# Altium PCB LEADER_10_15.PcbDoc
Units mm, origin at the board's own origin, x right, y up, seen from the top; angles counter-clockwise.
Board outline 60 x 72 mm, 4 copper layers (Top Layer, Mid-Layer 1, Mid-Layer 2, Bottom Layer); 42 components, 40 nets, 211 pads, 93 vias.
Unrouted connection lines stored in the file: 49.
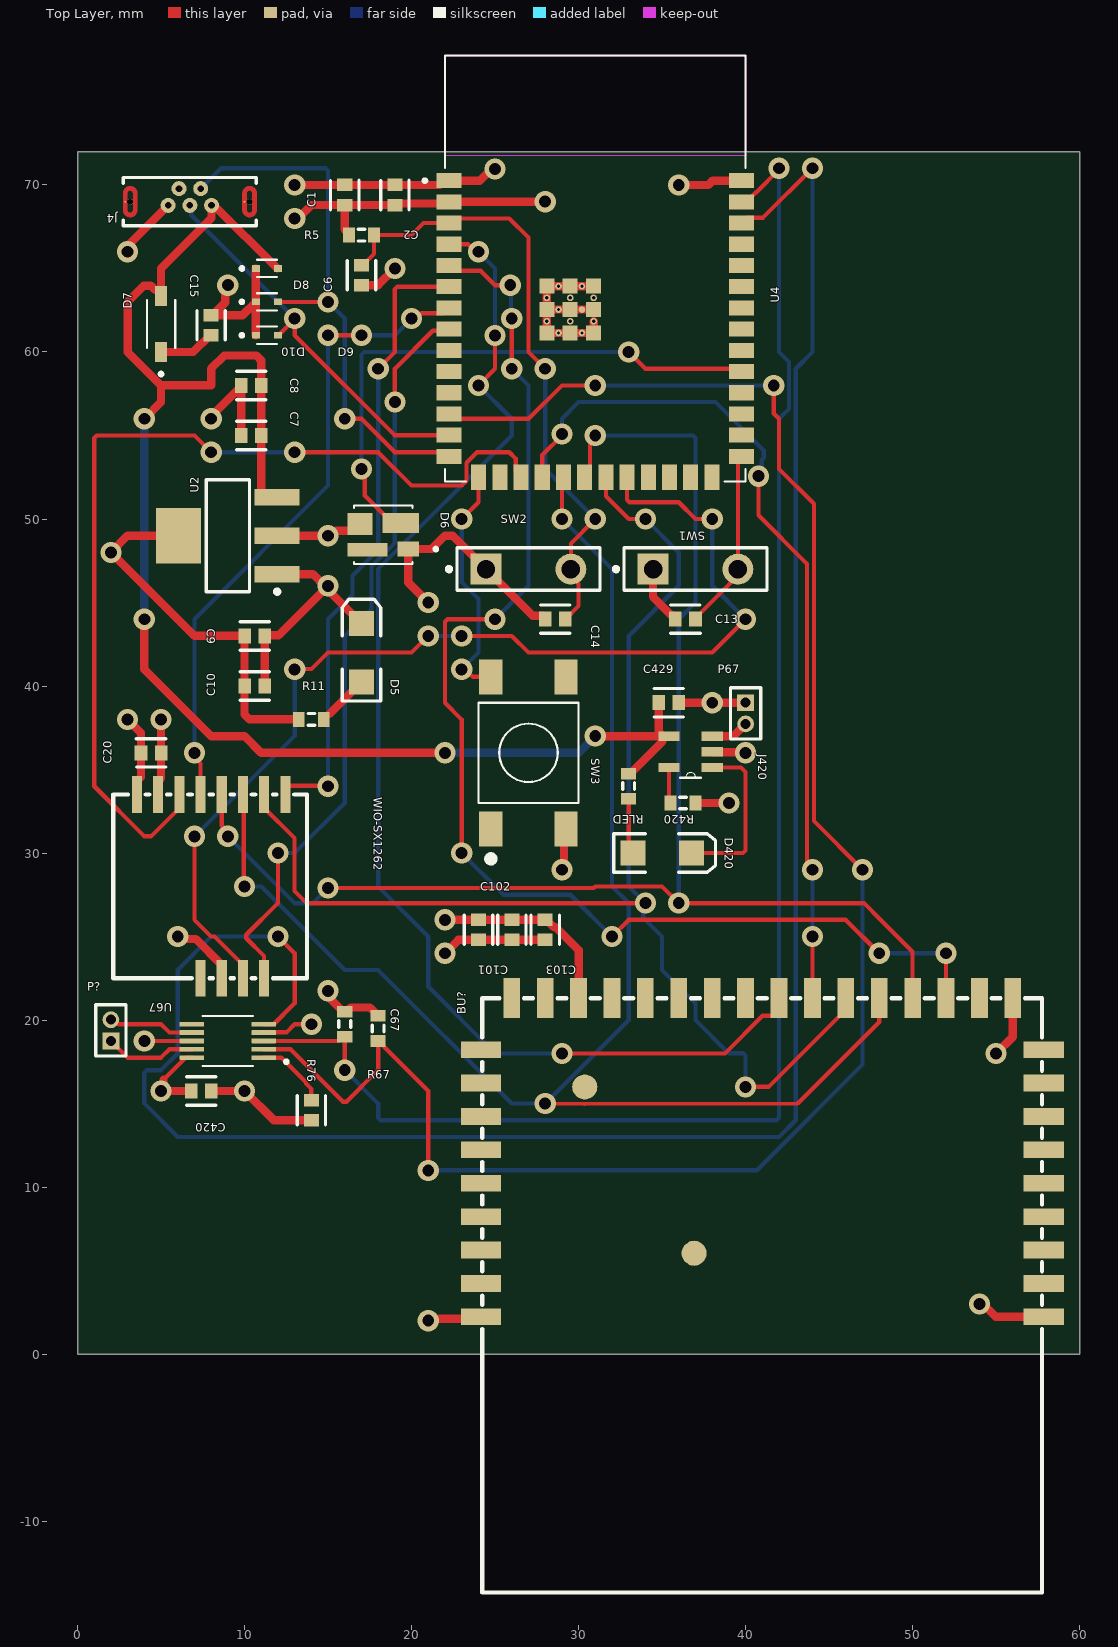
[diagram p0: Top Layer view]
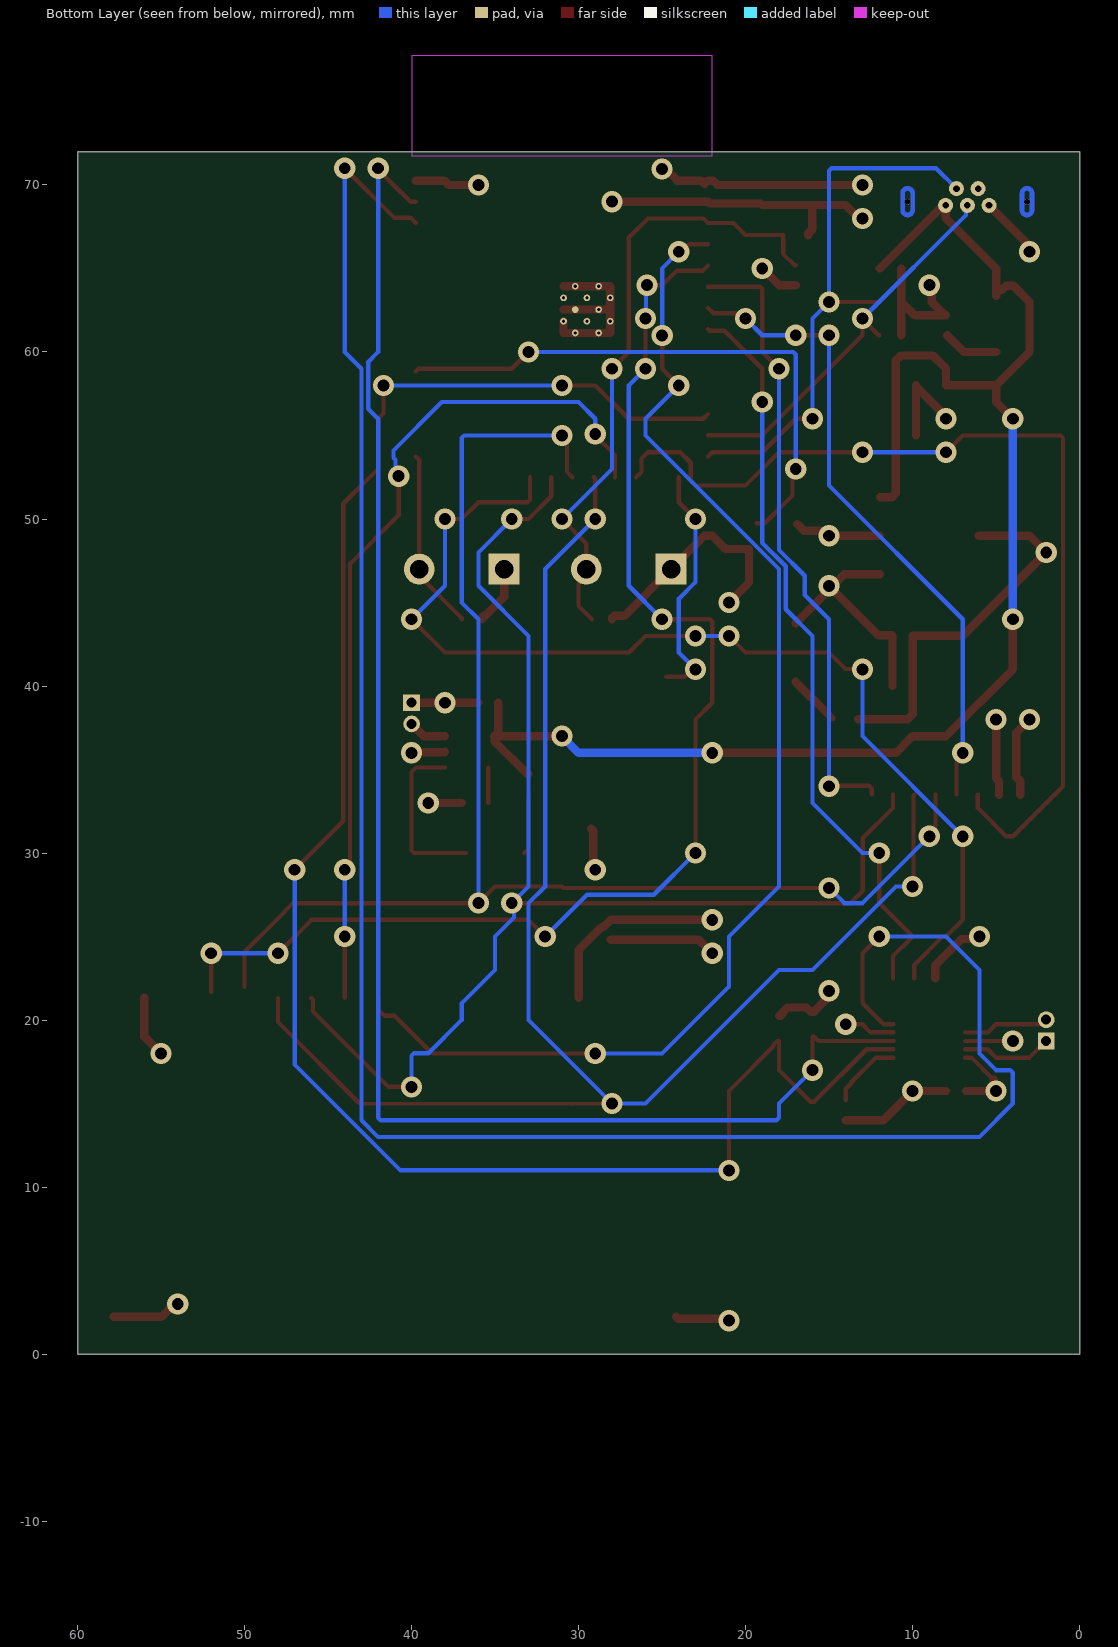
[diagram p1: Bottom Layer view, seen from below]
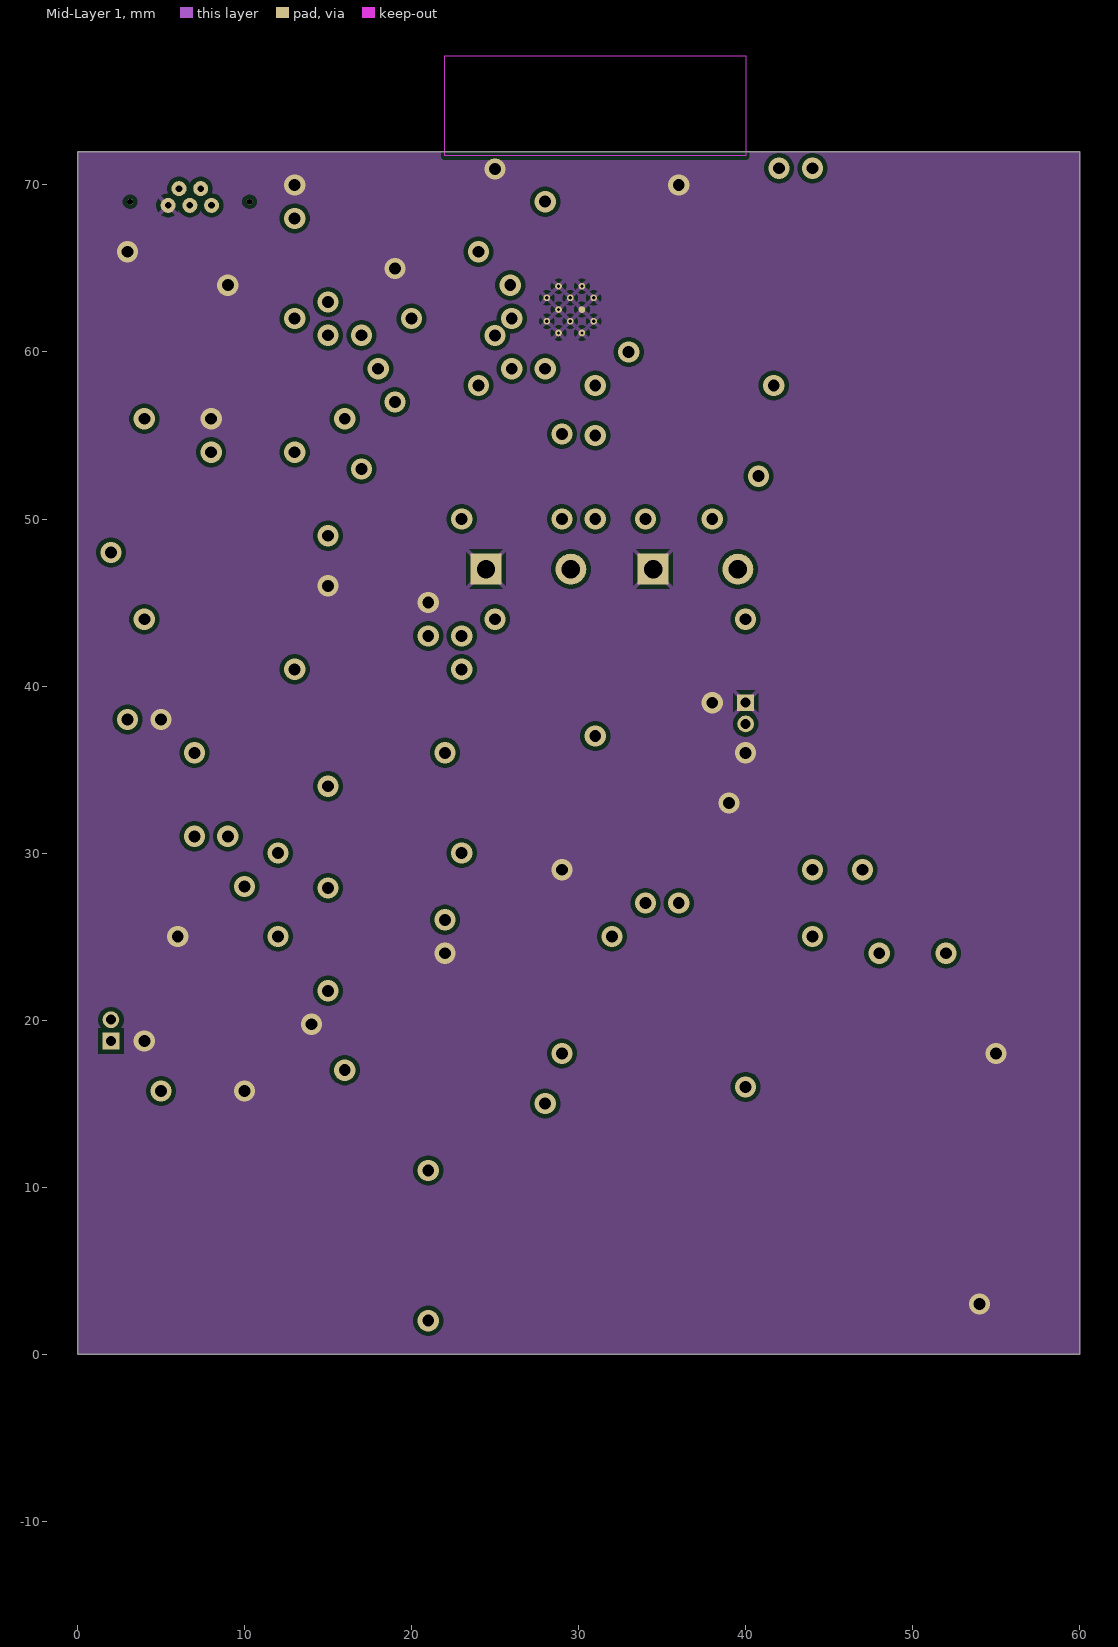
[diagram p2: Mid-Layer 1]
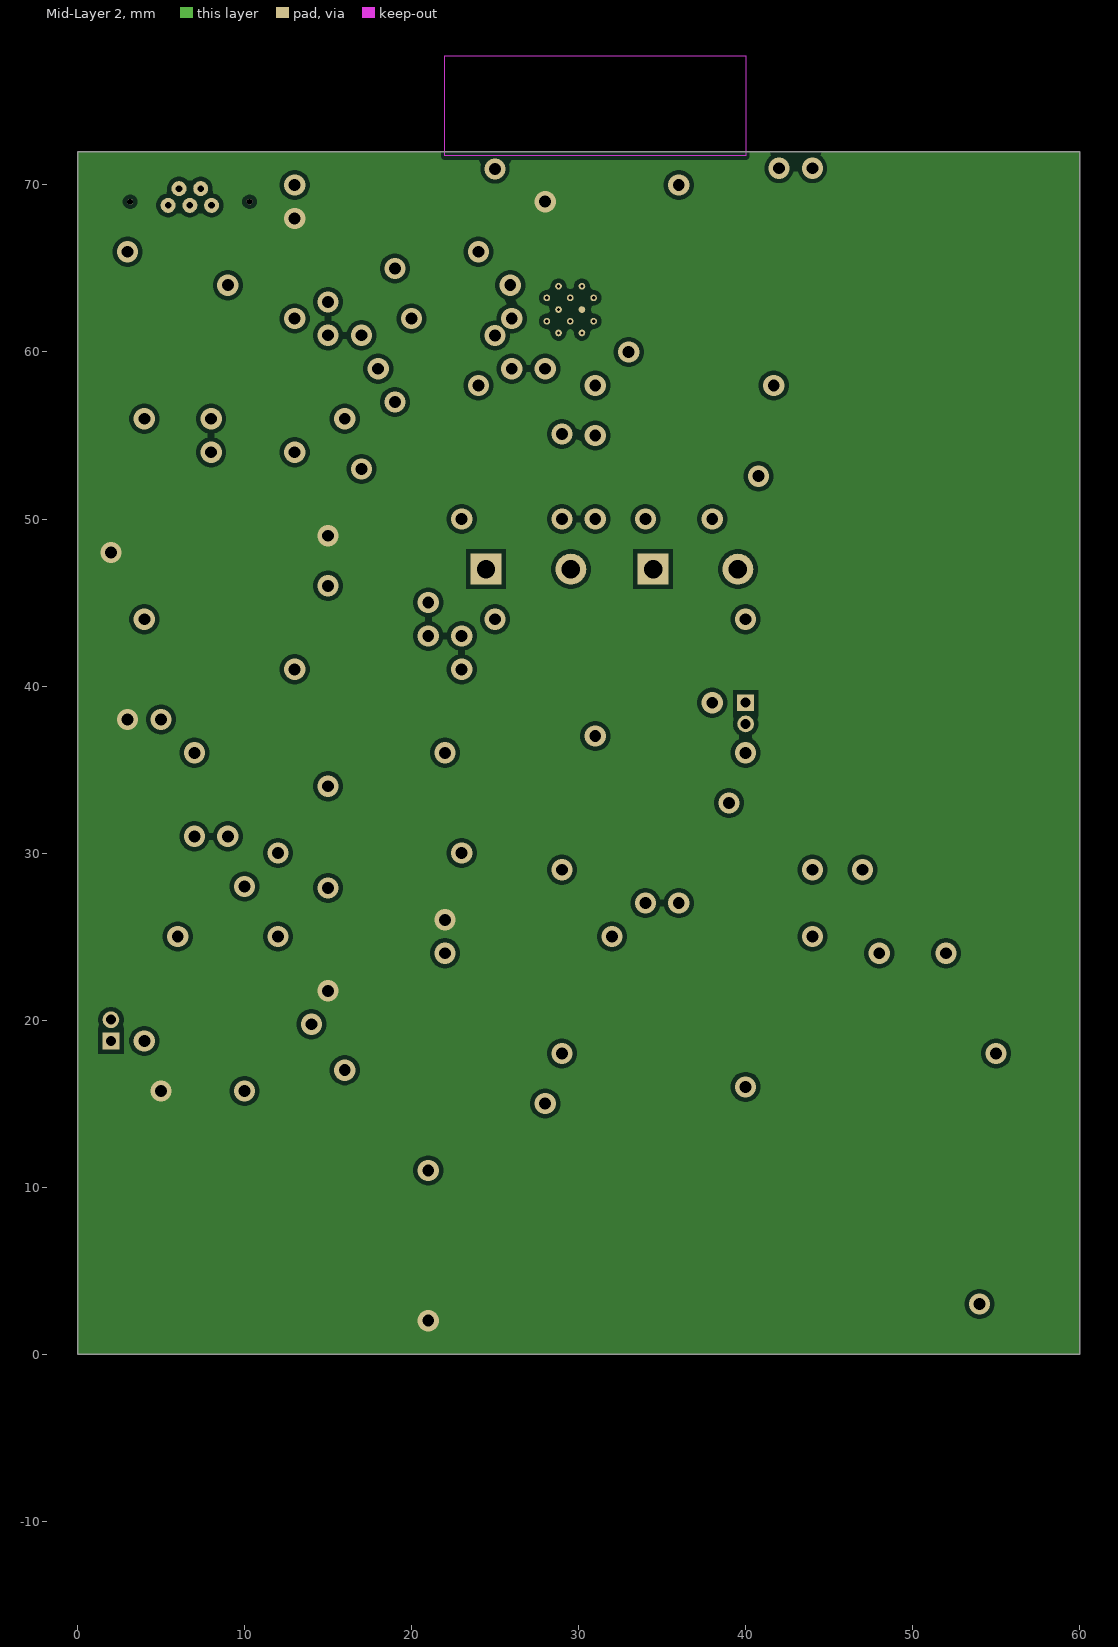
[diagram p3: Mid-Layer 2]
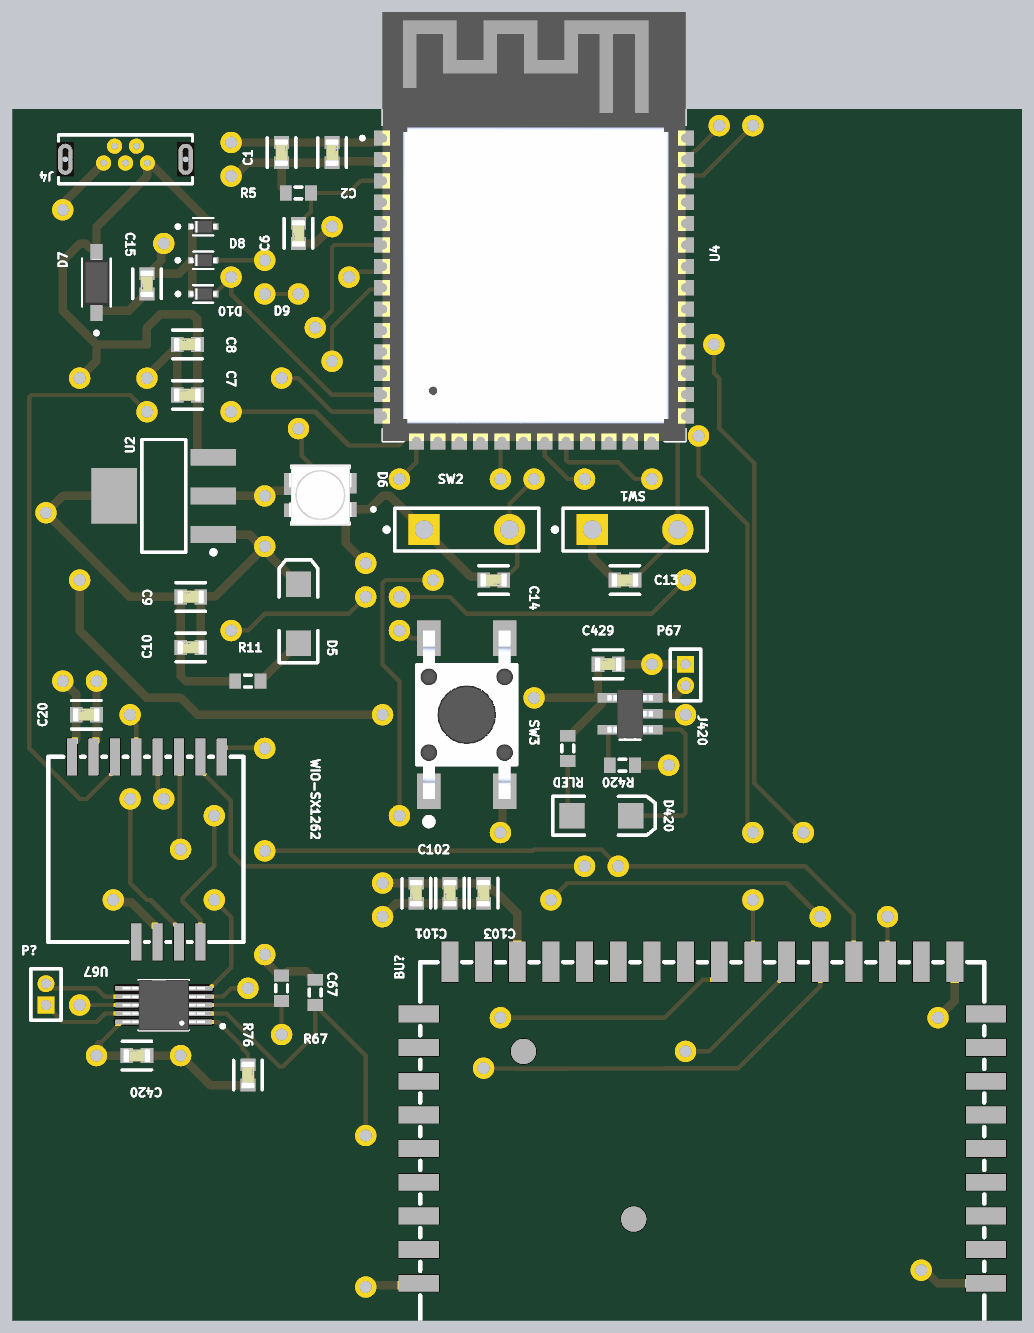
[diagram p4: 3D render of the assembled board from above, using the file's embedded part models]

## Layer stack, top to bottom
Top Solder: solder mask 0.0102, Solder Resist, Dk 3.5
Top Layer: signal copper 0.0356
Dielectric 1: dielectric 0.32, FR-4, Dk 4.8
Mid-Layer 1: signal copper 0.0356
Dielectric3: dielectric 0.32, FR-4, Dk 4.8
Mid-Layer 2: signal copper 0.0356
Dielectric2: dielectric 0.32, FR-4, Dk 4.8
Bottom Layer: signal copper 0.0356
Bottom Solder: solder mask 0.0102, Solder Resist, Dk 3.5

## Board outline
0,0 60,0 60,72 0,72

## Design rules (kind name [scope] priority, off if disabled: settings)
Clearance poly_clear [InPolygon] p1: gap=0.254 ignorepadtopadclearanceinfootprint=FALSE
Clearance [All] p2: gap=0.15 ignorepadtopadclearanceinfootprint=FALSE
Clearance U67_Clearance [InComponent('U67')] p3: gap=0.15 ignorepadtopadclearanceinfootprint=FALSE
HoleToHoleClearance [All] p1: gap=0.1 allowstackedmicrovias=TRUE
MinimumSolderMaskSliver [All] p1: minsoldermaskwidth=0.01
PolygonConnect [All] p1: thpad.connectstyle=Relief thpad.reliefconductorwidth=0.254 thpad.reliefentries=4 thpad.polygonreliefangle="45 Angle" thpad.airgapwidth=0.254 smdpad.connectstyle=Relief smdpad.reliefconductorwidth=0.254 smdpad.reliefentries=4 smdpad.polygonreliefangle="90 Angle" smdpad.airgapwidth=0.254 via.connectstyle=Direct via.reliefconductorwidth=0.254 via.reliefentries=4 via.polygonreliefangle="90 Angle" via.airgapwidth=0.254
RoutingVias [All] p1: holewidth=0.711 width=1.27 viastyle="Through Hole" minholewidth=0.711 minwidth=1.27 maxholewidth=0.711 maxwidth=1.27
SilkToSilkClearance [All] p1: silktosilkclearance=0.1
SilkToSolderMaskClearance [IsPad] p1: minsilkscreentomaskgap=0.1 clearancetoexposedcopper=TRUE
SolderMaskExpansion [All] p1: expansion=0 istentingtop=FALSE
Width C15 [InNet('C15_1')] p1: maxlimit=0.7 minlimit=0.254 preferedwidth=0.4
Width 3V3_Width [InNet('3V3')] p2: maxlimit=0.7 minlimit=0.254 preferedwidth=0.5
Width GD_WIDTH [InNet('GND')] p3: maxlimit=0.7 minlimit=0.254 preferedwidth=0.5
Width 5V_Width [InNet('5V')] p4: maxlimit=0.7 minlimit=0.254 preferedwidth=0.5
Width [All] p5: maxlimit=0.7 minlimit=0.254 preferedwidth=0.254
26 further rules are at their usual default settings.

## Components (designator, comment, footprint, x,y, rotation, side; value= is the part's Value field where it differs from the comment)
BU? "7.9872GHz；6.4896GHz" WIRELM-SMD_BU04 41,11.777 r180 top
C1 "Cap" FP-C0603C-CF-MFG 19,69.4 r270 top value=10uF
C2 "Cap" FP-C0603C-CF-MFG 16,69.4 r270 top value=1uF
C6 "Cap" FP-C0603C-CF-MFG 17,64.6 r90 top value=1uF
C7 "Cap" FP-C0603C-CF-MFG 10.4,55 r0 top value=10uF
C8 "Cap" FP-C0603C-CF-MFG 10.4,58 r0 top value=.1uF
C9 "Cap" FP-C0603C-CF-MFG 10.6,43 r0 top value=.1uF
C10 "Cap" FP-C0603C-CF-MFG 10.6,40 r0 top value=10uF
C13 "Cap" FP-C0603C-CF-MFG 36.4,44 r180 top value=.1uF
C14 "Cap" FP-C0603C-CF-MFG 28.6,44 r180 top value=.1uF
C15 "Cap" FP-C0603C-CF-MFG 8,61.6 r90 top value=10uF
C20 "Cap" FP-C0603C-CF-MFG 4.4,36 r0 top value=1uF
C67 "Cap" FP-C0603C-CF-MFG 14,14.6 r270 top value=1uF
C101 "Cap" FP-C0603C-CF-MFG 24,25.4 r90 top value=100nF
C102 "Cap" FP-C0603C-CF-MFG 26,25.4 r90 top value=1uF
C103 "Cap" FP-C0603C-CF-MFG 28,25.4 r90 top value=10uF
C420 "Cap" FP-C0603C-CF-MFG 7.4,15.75 r0 top value=1uF
C429 "Cap" FP-C0603C-CF-MFG 35.4,39 r0 top value=4.7uF
D5 "LED2" 3.2X1.6X1.1 17,42 r90 top
D6 "SK6812MINI-012" LED_SK6812MINI-012 18.3,49.05 r180 top
D7 "1N5819HW-7-F" SOD3715X145N 5,61.68 r90 top
D8 "LESD5D5.0CT1G" TVS_LESD5D5.0CT1G 11.34,65 r0 top
D9 "LESD5D5.0CT1G" TVS_LESD5D5.0CT1G 11.34,61 r0 top
D10 "LESD5D5.0CT1G" TVS_LESD5D5.0CT1G 11.34,63 r0 top
D420 "LED2" 3.2X1.6X1.1 35,30 r0 top
J4 "USB3130-XX-X_REVD" GCT_USB3130-XX-X_REVD 6.725,69 r180 top
J420 "MCP73831T-2ACI/OT" SOT95P280X145-5N 36.705,36.06 r180 top
P67 "Header 2" MHDR1X2 40,39 r270 top
P? "Header 2" MHDR1X2 2,18.75 r90 top
R5 "Res3" J1-0603 17,67 r0 top value=10K
R11 "Res3" J1-0603 14,38 r0 top value=5.1K
R67 "Res3" J1-0603 18,19.5 r90 top value=4.7K
R76 "Res3" J1-0603 16,19.75 r90 top value=4.7K
R420 "Res3" J1-0603 36.25,33 r0 top value=10K
RLED "Res3" J1-0603 33,34 r270 top value=1K
SW1 "NTC013-AT1J-A160T" SPST-2 37,47 r0 top
SW2 "NTC013-AT1J-A160T" SPST-2 27,47 r0 top
SW3 "4-1437565-9" TE_4-1437565-9 27,36 r90 top
U2 "SGM2212-3.3XKC3G/TR" SOT223_M 9,49 r180 top
U4 "ESP32-S3-WROOM-1" XCVR_ESP32S3WROOM1N8R8 31,65 r0 top
U67 "DRV2605LDGST" SOP50P490X110-10N 9,18.75 r180 top
WIO-SX1262 "WIO-SX1262" WIRELM-SMD_WIO-SX1262 8,28 r180 top

## Footprints (in the part's own frame and the unit in brackets; to place one, negate y for a bottom-side part, rotate by r counter-clockwise, add the part's x,y. Pads: shape width x height; smd on the part's side, far side on the other; paste and mask are expansions set on the pad)
3.2X1.6X1.1 [mm] "SMT LED; 2 Flat Leads"
  rect 1.5x1.5 smd: 1(-1.75,0) 2(1.75,0)
  silkscreen extent -2.9,-1.15 3.2,1.15
FP-C0603C-CF-MFG [mm]
  rect 0.75x0.9 smd paste+0 mask+0: 1(-0.6,0) 2(0.6,0)
  silkscreen extent -0.88,-0.85 0.88,0.85, body extent -1.2,-0.6 1.2,0.6, height 0.25
GCT_USB3130-XX-X_REVD [mm]
  round 0.9 hole 0.4: 1(-1.3,0.22) 2(-0.65,-0.78) 3(0,0.22) 4(0.65,-0.78) 5(1.3,0.22)
  rect 0.1x0.1 smd paste-1 mask+0: 6(-3.275,0) 7(3.875,0)
  round 0.35 hole 0.35 unplated: ""(-3.575,0) ""(3.575,0)
  Top Layer region: -3.553,0.924 -3.531,0.923 -3.509,0.92 -3.487,0.916 -3.465,0.911 -3.444,0.904 -3.423,0.897 -3.402,0.888 -3.382,0.879 -3.362,0.868 -3.344,0.856 -3.325,0.844 -3.308,0.83 -3.291,0.816 -3.274,0.801 -3.259,0.784 -3.245,0.767 -3.231,0.75 -3.219,0.731 -3.207,0.712 -3.196,0.693 -3.187,0.673 -3.178,0.652 -3.171,0.631 -3.164,0.61 -3.159,0.588 -3.155,0.566 -3.152,0.544 -3.151,0.522 -3.15,0.5 -3.15,0 -3.4,0 -3.4,0.5 -3.4,0.509 -3.401,0.518 -3.402,0.527 -3.404,0.536 -3.406,0.545 -3.409,0.554 -3.412,0.563 -3.415,0.571 -3.419,0.579 -3.423,0.587 -3.428,0.595 -3.433,0.603 -3.439,0.61 -3.445,0.617 -3.451,0.624 -3.458,0.63 -3.465,0.636 -3.472,0.642 -3.48,0.647 -3.487,0.652 -3.496,0.656 -3.504,0.66 -3.512,0.663 -3.521,0.666 -3.53,0.669 -3.539,0.671 -3.548,0.673 -3.557,0.674 -3.566,0.675 -3.584,0.675 -3.593,0.674 -3.602,0.673 -3.611,0.671 -3.62,0.669 -3.629,0.666 -3.638,0.663 -3.646,0.66 -3.654,0.656 -3.663,0.652 -3.67,0.647 -3.678,0.642 -3.685,0.636 -3.692,0.63 -3.699,0.624 -3.705,0.617 -3.711,0.61 -3.717,0.603 -3.722,0.595 -3.727,0.588 -3.731,0.579 -3.735,0.571 -3.738,0.563 -3.741,0.554 -3.744,0.545 -3.746,0.536 -3.748,0.527 -3.749,0.518 -3.75,0.509 -3.75,0.5 -3.75,0 -4,0 -4,0.5 -3.999,0.522 -3.998,0.544 -3.995,0.566 -3.991,0.588 -3.986,0.61 -3.979,0.631 -3.972,0.652 -3.963,0.673 -3.954,0.693 -3.943,0.713 -3.931,0.731 -3.919,0.75 -3.905,0.767 -3.891,0.784 -3.876,0.801 -3.859,0.816 -3.842,0.83 -3.825,0.844 -3.806,0.856 -3.788,0.868 -3.768,0.879 -3.748,0.888 -3.727,0.897 -3.706,0.904 -3.685,0.911 -3.663,0.916 -3.641,0.92 -3.619,0.923 -3.597,0.924 -3.575,0.925
  Top Layer region: -3.15,-0.5 -3.151,-0.522 -3.152,-0.544 -3.155,-0.566 -3.159,-0.588 -3.164,-0.61 -3.171,-0.631 -3.178,-0.652 -3.187,-0.673 -3.196,-0.693 -3.207,-0.712 -3.219,-0.731 -3.231,-0.75 -3.245,-0.767 -3.259,-0.784 -3.274,-0.801 -3.291,-0.816 -3.308,-0.83 -3.325,-0.844 -3.344,-0.856 -3.362,-0.868 -3.382,-0.879 -3.402,-0.888 -3.423,-0.897 -3.444,-0.904 -3.465,-0.911 -3.487,-0.916 -3.509,-0.92 -3.531,-0.923 -3.553,-0.924 -3.575,-0.925 -3.597,-0.924 -3.619,-0.923 -3.641,-0.92 -3.663,-0.916 -3.685,-0.911 -3.706,-0.904 -3.727,-0.897 -3.748,-0.888 -3.768,-0.879 -3.788,-0.868 -3.806,-0.856 -3.825,-0.844 -3.842,-0.83 -3.859,-0.816 -3.876,-0.801 -3.891,-0.784 -3.905,-0.767 -3.919,-0.75 -3.931,-0.731 -3.943,-0.713 -3.954,-0.693 -3.963,-0.673 -3.972,-0.652 -3.979,-0.631 -3.986,-0.61 -3.991,-0.588 -3.995,-0.566 -3.998,-0.544 -3.999,-0.522 -4,-0.5 -4,0 -3.75,0 -3.75,-0.5 -3.75,-0.509 -3.749,-0.518 -3.748,-0.527 -3.746,-0.536 -3.744,-0.545 -3.741,-0.554 -3.738,-0.563 -3.735,-0.571 -3.731,-0.579 -3.727,-0.588 -3.722,-0.595 -3.717,-0.603 -3.711,-0.61 -3.705,-0.617 -3.699,-0.624 -3.692,-0.63 -3.685,-0.636 -3.678,-0.642 -3.67,-0.647 -3.663,-0.652 -3.654,-0.656 -3.646,-0.66 -3.638,-0.663 -3.629,-0.666 -3.62,-0.669 -3.611,-0.671 -3.602,-0.673 -3.593,-0.674 -3.584,-0.675 -3.566,-0.675 -3.557,-0.674 -3.548,-0.673 -3.539,-0.671 -3.53,-0.669 -3.521,-0.666 -3.512,-0.663 -3.504,-0.66 -3.496,-0.656 -3.487,-0.652 -3.48,-0.647 -3.472,-0.642 -3.465,-0.636 -3.458,-0.63 -3.451,-0.624 -3.445,-0.617 -3.439,-0.61 -3.433,-0.603 -3.428,-0.595 -3.423,-0.587 -3.419,-0.579 -3.415,-0.571 -3.412,-0.563 -3.409,-0.554 -3.406,-0.545 -3.404,-0.536 -3.402,-0.527 -3.401,-0.518 -3.4,-0.509 -3.4,-0.5 -3.4,0 -3.15,0
  Top Layer region: 3.597,0.924 3.619,0.923 3.641,0.92 3.663,0.916 3.685,0.911 3.706,0.904 3.727,0.897 3.748,0.888 3.768,0.879 3.788,0.868 3.806,0.856 3.825,0.844 3.842,0.83 3.859,0.816 3.876,0.801 3.891,0.784 3.905,0.767 3.919,0.75 3.931,0.731 3.943,0.713 3.954,0.693 3.963,0.673 3.972,0.652 3.979,0.631 3.986,0.61 3.991,0.588 3.995,0.566 3.998,0.544 3.999,0.522 4,0.5 4,0 3.75,0 3.75,0.5 3.75,0.509 3.749,0.518 3.748,0.527 3.746,0.536 3.744,0.545 3.741,0.554 3.738,0.563 3.735,0.571 3.731,0.579 3.727,0.588 3.722,0.595 3.717,0.603 3.711,0.61 3.705,0.617 3.699,0.624 3.692,0.63 3.685,0.636 3.678,0.642 3.67,0.647 3.663,0.652 3.654,0.656 3.646,0.66 3.638,0.663 3.629,0.666 3.62,0.669 3.611,0.671 3.602,0.673 3.593,0.674 3.584,0.675 3.566,0.675 3.557,0.674 3.548,0.673 3.539,0.671 3.53,0.669 3.521,0.666 3.512,0.663 3.504,0.66 3.496,0.656 3.487,0.652 3.48,0.647 3.472,0.642 3.465,0.636 3.458,0.63 3.451,0.624 3.445,0.617 3.439,0.61 3.433,0.603 3.428,0.595 3.423,0.587 3.419,0.579 3.415,0.571 3.412,0.563 3.409,0.554 3.406,0.545 3.404,0.536 3.402,0.527 3.401,0.518 3.4,0.509 3.4,0.5 3.4,0 3.15,0 3.15,0.5 3.151,0.522 3.152,0.544 3.155,0.566 3.159,0.588 3.164,0.61 3.171,0.631 3.178,0.652 3.187,0.673 3.196,0.693 3.207,0.712 3.219,0.731 3.231,0.75 3.245,0.767 3.259,0.784 3.274,0.801 3.291,0.816 3.308,0.83 3.325,0.844 3.344,0.856 3.362,0.868 3.382,0.879 3.402,0.888 3.423,0.897 3.444,0.904 3.465,0.911 3.487,0.916 3.509,0.92 3.531,0.923 3.553,0.924 3.575,0.925
  Top Layer region: 4,-0.5 3.999,-0.522 3.998,-0.544 3.995,-0.566 3.991,-0.588 3.986,-0.61 3.979,-0.631 3.972,-0.652 3.963,-0.673 3.954,-0.693 3.943,-0.713 3.931,-0.731 3.919,-0.75 3.905,-0.767 3.891,-0.784 3.876,-0.801 3.859,-0.816 3.842,-0.83 3.825,-0.844 3.806,-0.856 3.788,-0.868 3.768,-0.879 3.748,-0.888 3.727,-0.897 3.706,-0.904 3.685,-0.911 3.663,-0.916 3.641,-0.92 3.619,-0.923 3.597,-0.924 3.575,-0.925 3.553,-0.924 3.531,-0.923 3.509,-0.92 3.487,-0.916 3.465,-0.911 3.444,-0.904 3.423,-0.897 3.402,-0.888 3.382,-0.879 3.362,-0.868 3.344,-0.856 3.325,-0.844 3.308,-0.83 3.291,-0.816 3.274,-0.801 3.259,-0.784 3.245,-0.767 3.231,-0.75 3.219,-0.731 3.207,-0.712 3.196,-0.693 3.187,-0.673 3.178,-0.652 3.171,-0.631 3.164,-0.61 3.159,-0.588 3.155,-0.566 3.152,-0.544 3.151,-0.522 3.15,-0.5 3.15,0 3.4,0 3.4,-0.5 3.4,-0.509 3.401,-0.518 3.402,-0.527 3.404,-0.536 3.406,-0.545 3.409,-0.554 3.412,-0.563 3.415,-0.571 3.419,-0.579 3.423,-0.587 3.428,-0.595 3.433,-0.603 3.439,-0.61 3.445,-0.617 3.451,-0.624 3.458,-0.63 3.465,-0.636 3.472,-0.642 3.48,-0.647 3.487,-0.652 3.496,-0.656 3.504,-0.66 3.512,-0.663 3.521,-0.666 3.53,-0.669 3.539,-0.671 3.548,-0.673 3.557,-0.674 3.566,-0.675 3.584,-0.675 3.593,-0.674 3.602,-0.673 3.611,-0.671 3.62,-0.669 3.629,-0.666 3.638,-0.663 3.646,-0.66 3.654,-0.656 3.663,-0.652 3.67,-0.647 3.678,-0.642 3.685,-0.636 3.692,-0.63 3.699,-0.624 3.705,-0.617 3.711,-0.61 3.717,-0.603 3.722,-0.595 3.727,-0.588 3.731,-0.579 3.735,-0.571 3.738,-0.563 3.741,-0.554 3.744,-0.545 3.746,-0.536 3.748,-0.527 3.749,-0.518 3.75,-0.509 3.75,-0.5 3.75,0 4,0
  Bottom Layer region: -3.553,0.924 -3.531,0.923 -3.509,0.92 -3.487,0.916 -3.465,0.911 -3.444,0.904 -3.423,0.897 -3.402,0.888 -3.382,0.879 -3.362,0.868 -3.344,0.856 -3.325,0.844 -3.308,0.83 -3.291,0.816 -3.274,0.801 -3.259,0.784 -3.245,0.767 -3.231,0.75 -3.219,0.731 -3.207,0.712 -3.196,0.693 -3.187,0.673 -3.178,0.652 -3.171,0.631 -3.164,0.61 -3.159,0.588 -3.155,0.566 -3.152,0.544 -3.151,0.522 -3.15,0.5 -3.15,0 -3.4,0 -3.4,0.5 -3.4,0.509 -3.401,0.518 -3.402,0.527 -3.404,0.536 -3.406,0.545 -3.409,0.554 -3.412,0.563 -3.415,0.571 -3.419,0.579 -3.423,0.587 -3.428,0.595 -3.433,0.603 -3.439,0.61 -3.445,0.617 -3.451,0.624 -3.458,0.63 -3.465,0.636 -3.472,0.642 -3.48,0.647 -3.487,0.652 -3.496,0.656 -3.504,0.66 -3.512,0.663 -3.521,0.666 -3.53,0.669 -3.539,0.671 -3.548,0.673 -3.557,0.674 -3.566,0.675 -3.584,0.675 -3.593,0.674 -3.602,0.673 -3.611,0.671 -3.62,0.669 -3.629,0.666 -3.638,0.663 -3.646,0.66 -3.654,0.656 -3.663,0.652 -3.67,0.647 -3.678,0.642 -3.685,0.636 -3.692,0.63 -3.699,0.624 -3.705,0.617 -3.711,0.61 -3.717,0.603 -3.722,0.595 -3.727,0.588 -3.731,0.579 -3.735,0.571 -3.738,0.563 -3.741,0.554 -3.744,0.545 -3.746,0.536 -3.748,0.527 -3.749,0.518 -3.75,0.509 -3.75,0.5 -3.75,0 -4,0 -4,0.5 -3.999,0.522 -3.998,0.544 -3.995,0.566 -3.991,0.588 -3.986,0.61 -3.979,0.631 -3.972,0.652 -3.963,0.673 -3.954,0.693 -3.943,0.713 -3.931,0.731 -3.919,0.75 -3.905,0.767 -3.891,0.784 -3.876,0.801 -3.859,0.816 -3.842,0.83 -3.825,0.844 -3.806,0.856 -3.788,0.868 -3.768,0.879 -3.748,0.888 -3.727,0.897 -3.706,0.904 -3.685,0.911 -3.663,0.916 -3.641,0.92 -3.619,0.923 -3.597,0.924 -3.575,0.925
  Bottom Layer region: -3.15,-0.5 -3.151,-0.522 -3.152,-0.544 -3.155,-0.566 -3.159,-0.588 -3.164,-0.61 -3.171,-0.631 -3.178,-0.652 -3.187,-0.673 -3.196,-0.693 -3.207,-0.712 -3.219,-0.731 -3.231,-0.75 -3.245,-0.767 -3.259,-0.784 -3.274,-0.801 -3.291,-0.816 -3.308,-0.83 -3.325,-0.844 -3.344,-0.856 -3.362,-0.868 -3.382,-0.879 -3.402,-0.888 -3.423,-0.897 -3.444,-0.904 -3.465,-0.911 -3.487,-0.916 -3.509,-0.92 -3.531,-0.923 -3.553,-0.924 -3.575,-0.925 -3.597,-0.924 -3.619,-0.923 -3.641,-0.92 -3.663,-0.916 -3.685,-0.911 -3.706,-0.904 -3.727,-0.897 -3.748,-0.888 -3.768,-0.879 -3.788,-0.868 -3.806,-0.856 -3.825,-0.844 -3.842,-0.83 -3.859,-0.816 -3.876,-0.801 -3.891,-0.784 -3.905,-0.767 -3.919,-0.75 -3.931,-0.731 -3.943,-0.713 -3.954,-0.693 -3.963,-0.673 -3.972,-0.652 -3.979,-0.631 -3.986,-0.61 -3.991,-0.588 -3.995,-0.566 -3.998,-0.544 -3.999,-0.522 -4,-0.5 -4,0 -3.75,0 -3.75,-0.5 -3.75,-0.509 -3.749,-0.518 -3.748,-0.527 -3.746,-0.536 -3.744,-0.545 -3.741,-0.554 -3.738,-0.563 -3.735,-0.571 -3.731,-0.579 -3.727,-0.588 -3.722,-0.595 -3.717,-0.603 -3.711,-0.61 -3.705,-0.617 -3.699,-0.624 -3.692,-0.63 -3.685,-0.636 -3.678,-0.642 -3.67,-0.647 -3.663,-0.652 -3.654,-0.656 -3.646,-0.66 -3.638,-0.663 -3.629,-0.666 -3.62,-0.669 -3.611,-0.671 -3.602,-0.673 -3.593,-0.674 -3.584,-0.675 -3.566,-0.675 -3.557,-0.674 -3.548,-0.673 -3.539,-0.671 -3.53,-0.669 -3.521,-0.666 -3.512,-0.663 -3.504,-0.66 -3.496,-0.656 -3.487,-0.652 -3.48,-0.647 -3.472,-0.642 -3.465,-0.636 -3.458,-0.63 -3.451,-0.624 -3.445,-0.617 -3.439,-0.61 -3.433,-0.603 -3.428,-0.595 -3.423,-0.587 -3.419,-0.579 -3.415,-0.571 -3.412,-0.563 -3.409,-0.554 -3.406,-0.545 -3.404,-0.536 -3.402,-0.527 -3.401,-0.518 -3.4,-0.509 -3.4,-0.5 -3.4,0 -3.15,0
  Bottom Layer region: 3.597,0.924 3.619,0.923 3.641,0.92 3.663,0.916 3.685,0.911 3.706,0.904 3.727,0.897 3.748,0.888 3.768,0.879 3.788,0.868 3.806,0.856 3.825,0.844 3.842,0.83 3.859,0.816 3.876,0.801 3.891,0.784 3.905,0.767 3.919,0.75 3.931,0.731 3.943,0.713 3.954,0.693 3.963,0.673 3.972,0.652 3.979,0.631 3.986,0.61 3.991,0.588 3.995,0.566 3.998,0.544 3.999,0.522 4,0.5 4,0 3.75,0 3.75,0.5 3.75,0.509 3.749,0.518 3.748,0.527 3.746,0.536 3.744,0.545 3.741,0.554 3.738,0.563 3.735,0.571 3.731,0.579 3.727,0.588 3.722,0.595 3.717,0.603 3.711,0.61 3.705,0.617 3.699,0.624 3.692,0.63 3.685,0.636 3.678,0.642 3.67,0.647 3.663,0.652 3.654,0.656 3.646,0.66 3.638,0.663 3.629,0.666 3.62,0.669 3.611,0.671 3.602,0.673 3.593,0.674 3.584,0.675 3.566,0.675 3.557,0.674 3.548,0.673 3.539,0.671 3.53,0.669 3.521,0.666 3.512,0.663 3.504,0.66 3.496,0.656 3.487,0.652 3.48,0.647 3.472,0.642 3.465,0.636 3.458,0.63 3.451,0.624 3.445,0.617 3.439,0.61 3.433,0.603 3.428,0.595 3.423,0.587 3.419,0.579 3.415,0.571 3.412,0.563 3.409,0.554 3.406,0.545 3.404,0.536 3.402,0.527 3.401,0.518 3.4,0.509 3.4,0.5 3.4,0 3.15,0 3.15,0.5 3.151,0.522 3.152,0.544 3.155,0.566 3.159,0.588 3.164,0.61 3.171,0.631 3.178,0.652 3.187,0.673 3.196,0.693 3.207,0.712 3.219,0.731 3.231,0.75 3.245,0.767 3.259,0.784 3.274,0.801 3.291,0.816 3.308,0.83 3.325,0.844 3.344,0.856 3.362,0.868 3.382,0.879 3.402,0.888 3.423,0.897 3.444,0.904 3.465,0.911 3.487,0.916 3.509,0.92 3.531,0.923 3.553,0.924 3.575,0.925
  Bottom Layer region: 4,-0.5 3.999,-0.522 3.998,-0.544 3.995,-0.566 3.991,-0.588 3.986,-0.61 3.979,-0.631 3.972,-0.652 3.963,-0.673 3.954,-0.693 3.943,-0.713 3.931,-0.731 3.919,-0.75 3.905,-0.767 3.891,-0.784 3.876,-0.801 3.859,-0.816 3.842,-0.83 3.825,-0.844 3.806,-0.856 3.788,-0.868 3.768,-0.879 3.748,-0.888 3.727,-0.897 3.706,-0.904 3.685,-0.911 3.663,-0.916 3.641,-0.92 3.619,-0.923 3.597,-0.924 3.575,-0.925 3.553,-0.924 3.531,-0.923 3.509,-0.92 3.487,-0.916 3.465,-0.911 3.444,-0.904 3.423,-0.897 3.402,-0.888 3.382,-0.879 3.362,-0.868 3.344,-0.856 3.325,-0.844 3.308,-0.83 3.291,-0.816 3.274,-0.801 3.259,-0.784 3.245,-0.767 3.231,-0.75 3.219,-0.731 3.207,-0.712 3.196,-0.693 3.187,-0.673 3.178,-0.652 3.171,-0.631 3.164,-0.61 3.159,-0.588 3.155,-0.566 3.152,-0.544 3.151,-0.522 3.15,-0.5 3.15,0 3.4,0 3.4,-0.5 3.4,-0.509 3.401,-0.518 3.402,-0.527 3.404,-0.536 3.406,-0.545 3.409,-0.554 3.412,-0.563 3.415,-0.571 3.419,-0.579 3.423,-0.587 3.428,-0.595 3.433,-0.603 3.439,-0.61 3.445,-0.617 3.451,-0.624 3.458,-0.63 3.465,-0.636 3.472,-0.642 3.48,-0.647 3.487,-0.652 3.496,-0.656 3.504,-0.66 3.512,-0.663 3.521,-0.666 3.53,-0.669 3.539,-0.671 3.548,-0.673 3.557,-0.674 3.566,-0.675 3.584,-0.675 3.593,-0.674 3.602,-0.673 3.611,-0.671 3.62,-0.669 3.629,-0.666 3.638,-0.663 3.646,-0.66 3.654,-0.656 3.663,-0.652 3.67,-0.647 3.678,-0.642 3.685,-0.636 3.692,-0.63 3.699,-0.624 3.705,-0.617 3.711,-0.61 3.717,-0.603 3.722,-0.595 3.727,-0.588 3.731,-0.579 3.735,-0.571 3.738,-0.563 3.741,-0.554 3.744,-0.545 3.746,-0.536 3.748,-0.527 3.749,-0.518 3.75,-0.509 3.75,-0.5 3.75,0 4,0
  silkscreen extent -3.98,-1.45 3.98,1.45
J1-0603 [mm] "Chip Resistor, Body 1.6x0.8mm, IPC High Density"
  rect 0.7x0.9 smd: 1(-0.75,0) 2(0.75,0)
  silkscreen extent -0.2,-0.35 0.2,0.35, body extent -0.85,-0.48 0.85,0.48, height 0.9
LED_SK6812MINI-012 [mm]
  rect 1.3x0.9 smd: 1(-1.5,0.85)
  rect 2.2x1.2 smd: 2(-1.05,-0.7)
  rect 1.5x1.3 smd: 3(1.4,-0.65)
  rect 2.4x0.8 smd: 4(0.95,0.9)
  silkscreen extent -3.25,-1.75 1.75,1.75, body extent -1.85,-1.75 1.85,1.75, height 1.1
MHDR1X2 [mm] "Connector; Header; 2 Position"
  rect 1x1 hole 0.6: 1(0,0)
  round 1 hole 0.6: 2(1.27,0)
  silkscreen extent -0.9,-0.9 2.17,0.9
SOD3715X145N [mm]
  rect 1.21x0.73 smd: A(1.68,0) C(-1.68,0)
  silkscreen extent -3.1,-0.85 1.43,0.85, body extent -1.83,-0.77 1.83,0.77, height 0.8
SOP50P490X110-10N [mm]
  rrect25% 1.47x0.28 smd paste+0 mask+0.102: 1(-2.15,1) 2(-2.15,0.5) 3(-2.15,0) 4(-2.15,-0.5) 5(-2.15,-1) 6(2.15,-1) 7(2.15,-0.5) 8(2.15,0) 9(2.15,0.5) 10(2.15,1)
  silkscreen extent -3.6,-1.5 1.5,1.5, body extent -2.45,-1.5 2.45,1.5, height 1.1
SOT95P280X145-5N [mil]
  rect 50x22 smd: 1(-51,37) 2(-51,0) 3(-51,-37) 4(51,-37) 5(51,37)
  silkscreen extent -24,49 24,61, body extent -53,-57 53,57, height 57
SOT223_M [mm] "SOT223, 4-Leads, Body 6.5x3.5mm, Pitch 2.3mm, Lead Span 7mm, IPC Low Density"
  rect 2.7x1 smd: 1(-2.95,2.3) 2(-2.95,0) 3(-2.95,-2.3)
  rect 2.7x3.3 smd: 4(2.95,0)
  silkscreen extent -3.08,-3.35 1.3,3.47, body extent -1.85,-3.35 1.85,3.35, height 1.7
SPST-2 [mm] "Switch; 2 Leads"
  rect 1.85x1.85 hole 1.1: 1(-2.54,0)
  round 1.85 hole 1.1: 2(2.54,0)
  silkscreen extent -4.89,-1.27 4.28,1.27
TE_4-1437565-9 [mm]
  rect 2.1x1.4 smd: 1(-4.55,2.25) 2(4.55,2.25) 3(-4.55,-2.25) 4(4.55,-2.25)
  silkscreen extent -6.55,-3 3,3, body extent -5,-3 5,3, height 7.26
TVS_LESD5D5.0CT1G [mm]
  rect 0.48x0.4 smd: 1(-0.66,0) 2(0.66,0)
  silkscreen extent -1.6,-0.52 0.6,0.52, body extent -0.8,-0.4 0.8,0.4, height 0.7
WIRELM-SMD_BU04 [mm]
  rect 2.4x1 smd paste+0 mask+0.051: 1(-16.85,9.55) 2(-16.85,7.55) 3(-16.85,5.55) 4(-16.85,3.55) 5(-16.85,1.55) 6(-16.85,-0.45) 7(-16.85,-2.45) 8(-16.85,-4.45) 9(-16.85,-6.45) 26(16.85,-6.45) 27(16.85,-4.45) 28(16.85,-2.45) 29(16.85,-0.45) 30(16.85,1.55) 31(16.85,3.55) 32(16.85,5.55) 33(16.85,7.55) 34(16.85,9.55)
  rect 1x2.4 smd paste+0 mask+0.051: 10(-15,-9.55) 11(-13,-9.55) 12(-11,-9.55) 13(-9,-9.55) 14(-7,-9.55) 15(-5,-9.55) 16(-3,-9.55) 17(-1,-9.55) 18(1,-9.55) 19(3,-9.55) 20(5,-9.55) 21(7,-9.55) 22(9,-9.55) 23(11,-9.55) 24(13,-9.55) 25(15,-9.55)
  round 1.5 smd paste+0 mask+0.051: 35(4.08,5.74) 36(10.63,-4.22)
  silkscreen extent -16.75,-9.52 16.76,26.05
WIRELM-SMD_WIO-SX1262 [mm]
  rect 0.6x2.2 smd paste+0 mask+0.051: 1(-4.445,-5.5) 2(-3.175,-5.5) 3(-1.905,-5.5) 4(-0.635,-5.5) 5(0.635,-5.5) 6(1.905,-5.5) 7(3.175,-5.5) 8(4.445,-5.5) 9(0.635,5.5) 10(-0.635,5.5) 11(-1.905,5.5) 12(-3.175,5.5)
  silkscreen extent -5.73,-5.5 5.86,5.5
XCVR_ESP32S3WROOM1N8R8 [mm]
  rect 1.5x0.9 smd: 1(-8.75,5.26) 2(-8.75,3.99) 3(-8.75,2.72) 4(-8.75,1.45) 6(-8.75,-1.09) 7(-8.75,-2.36) 8(-8.75,-3.63) 9(-8.75,-4.9) 10(-8.75,-6.17) 11(-8.75,-7.44) 12(-8.75,-8.71) 13(-8.75,-9.98) 14(-8.75,-11.25) 27(8.75,-11.25) 28(8.75,-9.98) 29(8.75,-8.71) 30(8.75,-7.44) 31(8.75,-6.17) 32(8.75,-4.9) 33(8.75,-3.63) 34(8.75,-2.36) 35(8.75,-1.09) 36(8.75,0.18) 37(8.75,1.45) 38(8.75,2.72) 39(8.75,3.99) 40(8.75,5.26) gpio5(-8.75,0.18)
  rect 0.9x1.5 smd: 15(-6.985,-12.5) 16(-5.715,-12.5) 17(-4.445,-12.5) 18(-3.175,-12.5) 19(-1.905,-12.5) 20(-0.635,-12.5) 21(0.635,-12.5) 22(1.905,-12.5) 23(3.175,-12.5) 24(4.445,-12.5) 25(5.715,-12.5) 26(6.985,-12.5)
  rect 0.9x0.9 smd: 41_1(-1.5,-2.46) 41_2(-2.9,-2.46) 41_3(-0.1,-2.46) 41_4(-2.9,-3.86) 41_5(-1.5,-3.86) 41_6(-0.1,-3.86) 41_7(-2.9,-1.06) 41_8(-1.5,-1.06) 41_9(-0.1,-1.06)
  round 0.4 hole 0.2 mask+0: 41_10(-1.5,-1.76) 41_11(-2.9,-1.76) 41_12(-0.1,-1.76) 41_13(-2.9,-3.16) 41_14(-1.5,-3.16) 41_15(-0.1,-3.16) 41_16(-2.2,-1.06) 41_17(-0.8,-1.06) 41_18(-2.2,-2.46) 41_20(-2.2,-3.86) 41_21(-0.8,-3.86)
  round 0.4 all layers, no hole mask+0: 41_19(-0.8,-2.46)
  Keep-Out Layer region: 9,6.75 -9,6.75 -9,12.75 9,12.75
  Keep-Out Layer region: 9,6.75 -9,6.75 -9,12.75 9,12.75
  silkscreen extent -10.3,-12.75 9,12.75, body extent -9,-12.75 9,12.75, height 3.25

## Part data
BU?: JLCPCB Part Class="Extended Part", Manufacturer=Ai-Thinker(安信可), Manufacturer Part=BU04, Contributor=lcsc, nameAlias=Value, spicePre=U, spiceSymbolName=BU04, Supplier=LCSC, Supplier Part=C42420050
C1 C2 C6 C7 C8 C9 C10 C13 C14 C15 C20 C67 C101 C102 C103 C420 C429: "Capacitor", LatestRevisionDate=17-Jul-2002, LatestRevisionNote="Re-released for DXP Platform.", PackageDescription="Radial Cap, Thru-Hole; 2 Leads; 0.3 in Pin Spacing", PackageReference=RAD-0.3, Published=8-Jun-2000, Publisher="Altium Limited"
D5 D420: "Typical RED, GREEN, YELLOW, AMBER GaAs LED", LatestRevisionDate=17-Jul-2002, LatestRevisionNote="Re-released for DXP Platform.", PackageDescription="SM LED; 2 Flat Leads", PackageReference=3.2X1.6X1.1, PackageVersion=Feb-2002, Published=8-Jun-2000, Publisher="Altium Limited"
D6: "INTEGRATED LIGHT SOURCE INTELLIGENT CONTROL OF CHIP-ON-TOP SMD TYPE LED", Package=Package, Check_prices=https://www.snapeda.com/parts/SK6812MINI-012/DONGGUANG+OPSCO+OPTOELECTRONICS+CO.%252C+LTD/view-part/?ref=eda, MF="DONGGUANG OPSCO OPTOELECTRONICS CO., LTD", MP=SK6812MINI-012, SnapEDA_Link=https://www.snapeda.com/parts/SK6812MINI-012/DONGGUANG+OPSCO+OPTOELECTRONICS+CO.%252C+LTD/view-part/?ref=snap
D7: library part DIODE_S, Part Number=ES313000200000, Part Reference=D7, Part Type=Diode, PCB Footprint=SOD123
D8 D9 D10: library part DIODE_BI_DIR, Part Number=ES313200200000, Part Reference=D8, Part Type=Diode, PCB Footprint=SOD523
J4: "USB - micro B USB 2.0 Receptacle Connector 5 Position Through Hole", Package=None, Availability="In Stock", Check_prices=https://www.snapeda.com/parts/USB3130-30-A/Global+Connector+Technology/view-part/?ref=eda, MF="Global Connector Technology", MP=USB3130-30-A, Price=None, SnapEDA_Link=https://www.snapeda.com/parts/USB3130-30-A/Global+Connector+Technology/view-part/?ref=snap
J420: "Charger IC Lithium Ion/Polymer SOT-23-5", Package="SOT-23 Microchip", Availability="In Stock", Check_prices=https://www.snapeda.com/parts/MCP73831T-2ACI/OT/Microchip/view-part/?ref=eda, MF=Microchip, MP=MCP73831T-2ACI/OT, Price=None, Purchase-URL=https://pricing.snapeda.com/search/part/MCP73831T-2ACI/OT/?ref=eda, SnapEDA_Link=https://www.snapeda.com/parts/MCP73831T-2ACI/OT/Microchip/view-part/?ref=snap
P67 P?: "Header, 2-Pin", LatestRevisionDate=17-Jul-2002, LatestRevisionNote="Re-released for DXP Platform.", Publisher="Altium Limited"
R5 R11 R67 R76 R420 RLED: "Resistor", LatestRevisionDate=29-May-2009, LatestRevisionNote="IPC-7351 Footprint Added.", PackageDescription="Chip Resistor", PackageReference=J1-0603, Published=8-Jun-2000, Publisher="Altium Limited"
SW1 SW2: library part SW_SP_4P, Part Number=ES511600400000, CLASS=DISCRETE, Part Type="Tact Switch", PCB Footprint=SW4-4P2X3P2X2P5-SMT, TIME=2004-11-29
  SW1: Part Reference=SW1
  SW2: Part Reference=SW2
SW3: "Alcoswitch, Switch, Tactile, 50 mA, SPST, Pushbutton, Off[On], FSM6JSMA", Contact_Current_Rating="50 mA", Package=None, Check_prices=https://www.snapeda.com/parts/FSM6JSMA/TE+Connectivity+ALCOSWITCH+Switches/view-part/?ref=eda, Configuration_Pole-Throw="Single Pole - Single Throw", EU_RoHS_Compliance=Compliant, MF="TE Connectivity", MP=FSM6JSMA, SnapEDA_Link=https://www.snapeda.com/parts/FSM6JSMA/TE+Connectivity+ALCOSWITCH+Switches/view-part/?ref=snap
U2: library part LDO1117, Part Number=ES411402000000, Part Reference=U2, Part Type="Power ICs", PCB Footprint=SOT223
U67: JLCPCB Part Class="Extended Part", Manufacturer=TI(德州仪器), Contributor=LCSC, Manufacturer Part=DRV2605LDGST, spicePre=U, spiceSymbolName=DRV2605LDGST, Supplier=LCSC, Supplier Part=C425927
WIO-SX1262: Manufacturer=null, Manufacturer Part=Wio-SX1262, Contributor=lcsc, spicePre=U, spiceSymbolName=WIO-SX1262, Supplier=LCSC, Supplier Part=C9900220371
U4: PCB Footprint=ESP32-S3-WROOM_NEW, Reference=U4

## Via types
v1: diameter 1.27, hole 0.711, Top Layer to Bottom Layer, 63 vias
v2: diameter 1.27/1.27/1.27/1.27 (per signal layer), hole 0.711, Top Layer to Bottom Layer, 30 vias

## Nets (pads, with @x,y where several pads share a name; then routed paths per layer and width w, separated by ;. In a path a pad name is that pad's centre, name@x,y a point inside that pad or via, vN(x,y) a via of type N, cw(c..) or ccw(c..) an arc to the next point about the centre after c; other vN are vias at no path point)
3V3: BU?.23 BU?.34 C1.2 C2.2 C9.1 C10.1 C20.1 C101.2 C102.2 C103.2 C420.1 D6.3 R5.1 R11.1 R67.2 R76.2 U2.2 U2.4 U4.2 U67.10 WIO-SX1262.8 | length 73.6
  Top Layer w0.254: 5.147,16.422 6.475,17.75 U67.10
  Top Layer w0.5: v2(3,38) 3.8,37.2 C20.1 3.8,34.545 3.555,34.3 WIO-SX1262.8 ; 5.147,16.422 5.147,15.897 v2(5,15.75) C420.1 ; U2.4 3,49 v2(2,48) 7,43 C9.1 10,38.293 10.293,38 R11.1 ; U2.2 v2(15,49) 15.208,49 15.508,49.3 16.5,49.3 D6.3 ; v2(13,68) 13.208,68 14.008,68.8 C2.2 16,67.35 16.25,67.1 R5.1 ; v2@15.147,21.603 15.147,21.253 15.9,20.5 16.1,20.5 16.35,20.75 17.5,20.75 17.8,20.45 17.8,20.35 17.9,20.25 R67.2 ; C2.2@16.075,68.8 C1.2 19.095,68.895 22.155,68.895 22.255,68.995 27.995,68.995 v2(28,69) ; v2(21,2) 21.113,2.113 24.037,2.113 BU?.34 ; v2(22,26) C101.2 C102.2 C103.2 28.075,26 28.5,25.575 28.616,25.575 30,24.191 BU?.23
  other v2: 15,21.75
3V3_R: D5.1 R11.2 | length 3.2
  Top Layer w0.254: R11.2 14.75,38.1 14.973,38.323 R11.2@15.073,38.323
  Top Layer w0.5: R11.2@15.073,38.323 D5.1
5V: C7.2 C8.2 C429.1 D7.A D8.2 J4.1 J420.4 RLED.1 U2.3 | length 93.2
  Top Layer w0.254: J4.1 J4.1@8.18,68.78
  Top Layer w0.5: v1(4,44) 4,41 8,37 10,37 11,36 v1(22,36) ; v1(4,56) 5,57 5,58 ; D7.A D7.A@5,63.6 ; J4.1 8.025,68.025 5,65 D7.A@5,63.6 ; J4.1@8.18,68.78 D8.2@11.96,65 ; U2.3 11.25,51.3 11,51.55 C7.2 C8.2 11,59.5 10.707,59.793 8.793,59.793 8,59 8,58 5,58 ; v1(31,37) J420.4@35.024,37 ; RLED.1 33.1,34.75 35.024,36.674 J420.4@35.024,37 ; C429.1 34.8,37.254 J420.4@35.024,37.029 ; 5,58 3,60 3,63 3.973,63.973 4.387,63.973 4.645,63.715 4.885,63.715 D7.A@5,63.6 ; J420.4@35.024,37 35.054,37 J420.4@35.024,37.029 ; J420.4@35.024,37 J420.4@35.024,37.029
  Bottom Layer w0.5: v1(4,44) v1(4,56) ; v1(22,36) 30,36 v1(31,37)
C15_1: C15.1 D7.C | length 3.4
  Top Layer w0.254: C15.1@7.925,61 C15.1
  Top Layer w0.5: D7.C 6.925,60 C15.1@7.925,61
C67: C67.1 U67.1 | length 4.3
  Top Layer w0.254: U67.1 12.2,17.75 13.677,16.273 13.677,16.198 14,15.875 C67.1
C100: 
CHIP_PU: C6.2 C14.1 R5.2 SW2.2 U4.3 | length 37.9
  Top Layer w0.254: C6.2 17.075,65.2 17.75,65.875 R5.2 20,67 20.72,67.72 U4.3 22.53,68 25.851,68 27,66.851 27,60 v1(28,59) ; C14.1 30,44.8 30,46.108 29.54,46.568 SW2.2 29.54,48.54 v1(31,50)
  Bottom Layer w0.254: v1(28,59) 28,53 v1(31,50)
GND: BU?.1 BU?.10 C1.1 C2.1 C6.1 C7.1 C8.1 C9.2 C10.2 C13.2 C14.2 C15.2 C20.2 C67.2 C101.1 C102.1 C103.1 C420.2 C429.2 D5.2 D6.1 D8.1 D9.1 D10.1 J4.5 J420.2 P67.1 R420.2 SW1.1 SW2.1 SW3.3 U2.1 U4.1 U4.40 U4.41_1 U4.41_2 U4.41_3 U4.41_4 U4.41_5 U4.41_6 U4.41_7 U4.41_8 U4.41_9 U4.41_10 U4.41_11 U4.41_12 U4.41_13 U4.41_14 U4.41_15 U4.41_16 U4.41_17 U4.41_18 U4.41_19 U4.41_20 U4.41_21 U67.4 U67.8 WIO-SX1262.7 WIO-SX1262.10 | length 128.5
  Top Layer w0.254: v2(4,18.75) U67.8 ; U67.4 11.163,19.263 12.513,19.263 13,19.75 v2(14,19.75)
  Top Layer w0.5: v2@3,66.355 v2(3,66) 3.147,66.147 3.147,66.502 J4.5 ; WIO-SX1262.7 4.825,34.3 5,34.475 C20.2 v2(5,38) ; v2(6,25) 6.147,24.853 7.082,24.853 8.635,23.3 WIO-SX1262.10 ; C420.2 v2(10,15.75) 11.75,14 C67.2 ; v2(8,56) 8,56.125 9.8,57.925 C8.1 C7.1 ; v2(9,64) 8.853,63.853 8.853,62.978 8.075,62.2 C15.2 9.88,62.2 D10.1 ; D9.1 D10.1 ; D8.1 D10.1 ; C10.2 C9.2 11.232,43.032 12.032,43.032 v2(15,46) ; U2.1 14.092,46.7 14.792,46 v2(15,46) ; v2(13,70) C2.1 C1.1 21.69,70 21.95,70.26 U4.1 22.45,70.06 22.65,70.26 24.087,70.26 24.792,70.965 v2(25,70.965) ; D5.2 15.147,45.603 15.147,45.853 v2(15,46) ; C6.1 18,64 v2(19,65) ; v2(21,45) 19.8,46.2 D6.1 21.2,48.2 22,49 22.46,49 SW2.1 27.26,44.2 27.875,44.2 28,44.075 C14.2 ; v2(22,24) 22.8,24.8 C101.1 C102.1 C103.1 C103.1@28.075,24.8 ; v2(29,29) 29.125,29.125 29.125,31.325 SW3.3 ; U4.41_15 U4.41_6 U4.41_21 U4.41_5 U4.41_20 U4.41_4 U4.41_13 U4.41_2 ; U4.41_3 U4.41_19 U4.41_1 U4.41_18 U4.41_2 ; U4.41_9 U4.41_17 U4.41_8 U4.41_16 U4.41_7 U4.41_11 U4.41_2 ; SW1.1 34.46,45.34 35.6,44.2 35.675,44.2 35.8,44.075 C13.2 ; C429.2 v2(38,39) P67.1 ; v2(36,70) 37.773,70 38.033,70.26 U4.40 ; R420.2 v2(39,33) ; J420.2 38.029,36.031 39.969,36.031 v2(40,36) ; v2(54,3) 54.208,3 54.981,2.227 BU?.1 ; v2(55,18) 56,19 BU?.10
GPIO0: C13.1 SW1.2 U4.27 | length 10.9
  Top Layer w0.254: C13.1 37,44.075 39.54,46.615 SW1.2 39.54,53.54 U4.27
GPIO1: R76.1 U4.39 U67.3 | length 95.2
  Top Layer w0.254: U67.3 15.65,18.75 15.9,19 R76.1 v1(16,17) ; U4.39 40.05,68.99 40.593,69.533 40.615,69.533 42,70.918 v1(42,71)
  Bottom Layer w0.254: v1(16,17) 18,15 18,14.149 18.149,14 41.851,14 42,14.149 42,56 42.596,56.596 42.596,59.404 42,60 v1(42,71)
GPIO2: U4.38 U67.5 | length 126.2
  Top Layer w0.254: U67.5 11.745,19.75 13,21.005 13,24 v1(12,25) ; U4.38 40.073,68.043 41.043,68.043 v1(44,71)
  Bottom Layer w0.254: v1(12,25) 8,25 6,23 6,18 5,17 4.149,17 4,16.851 4,15 6,13 42,13 43,14 43,59 44,60 v1(44,71)
GPIO3: SW3.2 U4.15 | length 14.7
  Top Layer w0.254: v1(23,41) 23.219,41 23.669,40.55 SW3.2 ; v1(23,50) 24,51 24,52.485 U4.15
  Bottom Layer w0.254: v1(23,41) 24,42 24,45.218 23,46.218 v1(23,50)
GPIO4: BU?.17 U4.4 | length 76.6
  Top Layer w0.254: U4.4 23.381,66.45 23.831,66 v1(24,66) ; v1(24,58) 24.996,58.996 v1(24.996,60.996) ; v1(29,18) 38.765,18 41.019,20.254 41.627,20.254 42,20.627 BU?.17
  Bottom Layer w0.254: v1(24,58) 26,56 26,55 18,47 18,28 21,25 21,22 25,18 v1(29,18) ; v1(24,66) 24.996,65.004 v1(24.996,60.996)
GPIO5: BU?.12 U4.gpio5 | length 77.4
  Top Layer w0.254: U4.gpio5 22.573,64.857 24.143,64.857 25,64 v1(25.912,64) ; v1@23.044,29.956 v1(23,30) 23,38 22,39 22,43.851 22.149,44 v1(25,44) ; v1(26,59) v1(26,62) ; v1(32,25) 33,26 46,26 v1(48,24) ; BU?.12@52,21.695 v1(52,24)
  Bottom Layer w0.254: v1(23,30) 25.5,27.5 29.5,27.5 v1(32,25) ; v1(25,44) 27,46 27,58 v1(26,59) ; v1(25.912,64) 25.956,63.956 25.956,62.044 v1(26,62) ; v1(48,24) v1(52,24)
GPIO6: U4.6 WIO-SX1262.1 | length 37.7
  Top Layer w0.254: WIO-SX1262.1 12.445,33.859 12.618,34.032 14.968,34.032 v1(15,34) ; v1(18,59) 19,60 19,63.761 19.149,63.91 U4.6
  Bottom Layer w0.254: v1(15,34) 15,44 16.456,45.456 16.456,46.599 18,48.143 v1(18,59)
GPIO7: U4.7 WIO-SX1262.5 | length 38.9
  Top Layer w0.254: v1(7,36) 7,35.725 7.365,35.36 WIO-SX1262.5 ; v1(15,61) v1(17,61) ; v1(20,62) 20.275,62 20.592,62.317 21.927,62.317 U4.7
  Bottom Layer w0.254: v1(7,36) 7,44 15,52 v1(15,61) ; v1(17,61) 19,61 v1(20,62)
GPIO8: R67.1 U4.12 U67.2 | length 111.6
  Top Layer w0.254: U67.2 12.75,18.25 15.895,15.105 16.105,15.105 18,17 R67.1 18.1,18.75 18.323,18.527 18.323,18.427 21,15.75 v1(21,11) ; U4.12 22.54,56 27,56 29,58 v1(31,58) ; v1(41.684,58) 41.684,56.316 42,56 42,53 44.088,50.912 44.088,31.912 v1(47,29)
  Bottom Layer w0.254: v1(21,11) 40.667,11 47,17.333 v1(47,29) ; v1(31,58) v1(41.684,58)
GPIO9: U4.17 WIO-SX1262.6 | length 58.1
  Top Layer w0.254: WIO-SX1262.6 6.095,32.7 4.395,31 4,31 1,34 1,54.851 1.149,55 7,55 v1(8,54) ; v1(13,54) 18,54 20,52 23,52 23.288,52.288 23.288,53.365 23.923,54 25.851,54 26.232,53.619 26.232,52.823 U4.17
  Bottom Layer w0.254: v1(8,54) v1(13,54)
GPIO10: BU?.16 U4.18 | length 51.9
  Top Layer w0.254: U4.18 27.825,53.825 29,55 v1(29,55.088) ; v1(40.772,52.564) 40.772,50.228 43.684,47.316 43.684,29.316 v1(44,29) ; BU?.16 v1(44,25)
  Bottom Layer w0.254: v1(29,55.088) 29,56 30,57 38.192,57 41.088,54.104 41.088,53.663 40.966,53.541 40.966,52.758 v1(40.772,52.564) ; v1(44,25) v1(44,29)
GPIO11: BU?.14 U4.19 WIO-SX1262.3 | length 93.7
  Top Layer w0.254: WIO-SX1262.3 9.952,33.453 9.952,28.048 v1(10,28) ; v1(28,15) 30.357,14.97 ccw(c30.37,15.997) 30.373,14.97 43.12,15 43.195,15.074 48,19.88 BU?.14 ; v1(29,50) 29,52.405 U4.19
  Bottom Layer w0.254: v1(10,28) 11,28 16,23 18,23 26,15 v1(28,15) 33,20 33,27 32,28 32,47 v1(29,50)
GPIO12: BU?.13 U4.20 WIO-SX1262.4 | length 86.5
  Top Layer w0.254: WIO-SX1262.4 8.635,31.64 9,31.275 v1(9,31) ; v1(15,27.912) 30.912,27.912 31,28 35,28 v1(36,27) 47.092,27 48.092,26 50,24.092 BU?.13@50,22 ; U4.20 30.688,52.823 30.688,54.413 31,54.725 v1(31,55)
  Bottom Layer w0.254: v1@9.016,30.984 13,27 14.088,27 v1(15,27.912) ; v1(31,55) 36.851,55 37,54.851 37,45 36,44 36,31 v1(36,27)
GPIO13: BU?.15 U4.21 WIO-SX1262.2 | length 80.1
  Top Layer w0.254: WIO-SX1262.2 11.175,32.7 12.985,30.89 12.985,27.725 13.71,27 v1(34,27) ; U4.21 31.635,51.365 33,50 v1(34,50) ; v1(40,16) 41.373,16 45.895,20.522 45.895,21.222 BU?.15
  Bottom Layer w0.254: v1(34,50) 36,48 36,46 33,43 33,28 v1(34,27) 33.867,26.867 33.867,26.133 35,25 35,23 37,21 37,20 38.984,18.016 39.851,18.016 40,17.867 v1(40,16)
GPIO14: U4.22 WIO-SX1262.11 | length 65.1
  Top Layer w0.254: v1(7,31) 7,26 8,25 8.205,25 9.905,23.3 WIO-SX1262.11 ; v1(13,41) 13.016,41.016 14.016,41.016 15,42 20,42 v1(21,43) ; v1(23,43) 26,43 27,42 38,42 v1(40,44) ; U4.22 32.905,51.149 33.054,51 36,51 37,50 v1(38,50)
  Bottom Layer w0.254: v1(7,31) 13,37 v1(13,41) ; v1(21,43) v1(23,43) ; v1(38,50) 38,46 v1(40,44)
GPIO15: U4.8 WIO-SX1262.12 | length 45.4
  Top Layer w0.254: WIO-SX1262.12 11.168,22.507 11.168,23.832 10.105,24.895 10.105,25.105 12,27 v1(12,30) ; v1(19,57) 19,59 21.268,61.268 22.148,61.268 U4.8
  Bottom Layer w0.254: v1(12,30) 13,30 16,33 16,43 17.596,44.596 17.596,47.167 19,48.571 v1(19,57)
GPIO19: D9.2 J4.3 U4.13 | length 23.5
  Top Layer w0.254: D9.2 12.04,61 13,61.96 v1(13,62) 13,61 18.98,55.02 U4.13
  Bottom Layer w0.254: J4.3 6.806,68.699 6.806,68.194 v1@12.984,62.016
GPIO20: D10.2 J4.2 U4.14 | length 33.6
  Top Layer w0.254: D10.2 v1(15,63) ; v1(16,56) 17,56 19,54 22,54 U4.14
  Bottom Layer w0.254: J4.2 8.595,71 14.851,71 15,70.851 v1(15,63) 16,62 v1(16,56)
GPIO35: U4.28
GPIO38: D6.2 U4.31 | length 34.7
  Top Layer w0.254: v1(17,53) 17.194,52.806 17.194,51.406 18.85,49.75 D6.2 ; v1(33,60) 34,59 39.58,59 U4.31
  Bottom Layer w0.254: v1(17,53) 17,59.851 17.149,60 v1(33,60)
GPIO39: U4.32
GPIO42: U4.35
LED: D420.1 RLED.2 | length 3.4
  Top Layer w0.254: RLED.2 33,30.25 D420.1
LED1: 
LED2: 
LED3: 
OUT+: P?.2 U67.7 | length 5.2
  Top Layer w0.254: P?.2 2.202,20.02 2.472,19.75 5,19.75 5.5,19.25 U67.7
OUT-: P?.1 U67.9 | length 5.5
  Top Layer w0.254: P?.1 3,17.75 5,17.75 5.5,18.25 U67.9
PH1: J420.3 P67.2 | length 2.3
  Top Layer w0.5: J420.3 39.27,37 P67.2
PH2: 
PROG: J420.5 R420.1 | length 2.1
  Top Layer w0.254: R420.1@35.409,33 J420.5
STAT: D420.2 J420.1 | length 10.1
  Top Layer w0.254: D420.2 39.851,30 40,30.149 40,34.851 39.731,35.12 J420.1
pads on no net: BU?.2 BU?.3 BU?.4 BU?.5 BU?.6 BU?.7 BU?.8 BU?.9 BU?.11 BU?.18 BU?.19 BU?.20 BU?.21 BU?.22 BU?.24 BU?.25 BU?.26 BU?.27 BU?.28 BU?.29 BU?.30 BU?.31 BU?.32 BU?.33 BU?.35 BU?.36 D6.4 J4. J4.4 J4.6 J4.7 SW3.1 SW3.4 U4.9 U4.10 U4.11 U4.16 U4.23 U4.24 U4.25 U4.26 U4.29 U4.30 U4.33 U4.34 U4.36 U4.37 U67.6 WIO-SX1262.9

## Polygon pours and split planes (outlines as drawn)
3V3 on Mid-Layer 2 "3V3_L03_P001" (solid, pour order 1): 0,72 60,72 60,0 0,0
GND on Mid-Layer 1 "GND_L02_P000" (solid, remove dead copper, pour order 0): 0,72 60,72 60,0 0,0

## Text inside footprints (layer, text, board x,y; h text height)
U4: Mechanical 13 "ANTENNA" at 26.5,74.5 h1.27